# Altium PCB ACF_Out-v2.0.PcbDoc (part 1 of 3)
Units mm, origin at the board's own origin, x right, y up, seen from the top; angles counter-clockwise.
Board outline 145.27 x 100 mm, 2 copper layers (Top Layer, Bottom Layer), stack 1.57 mm thick; 63 components, 69 nets, 230 pads, 136 vias.
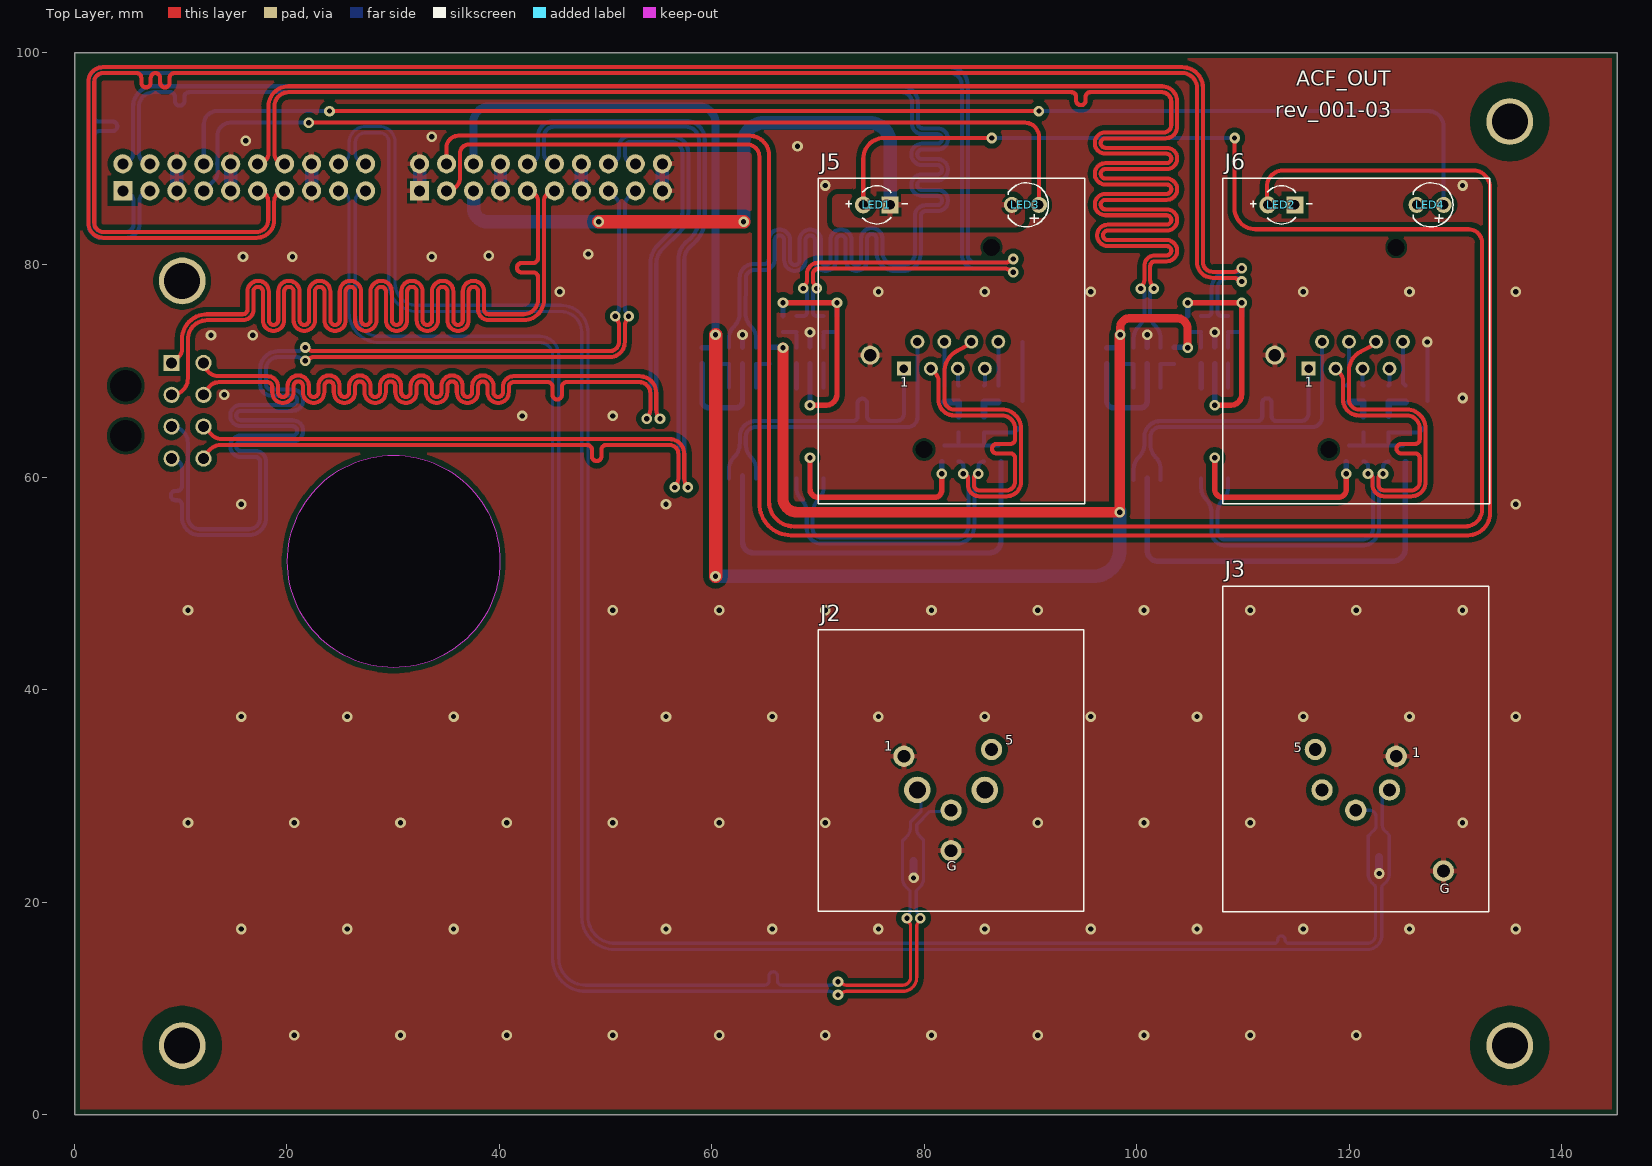
[diagram p0: Top Layer view]
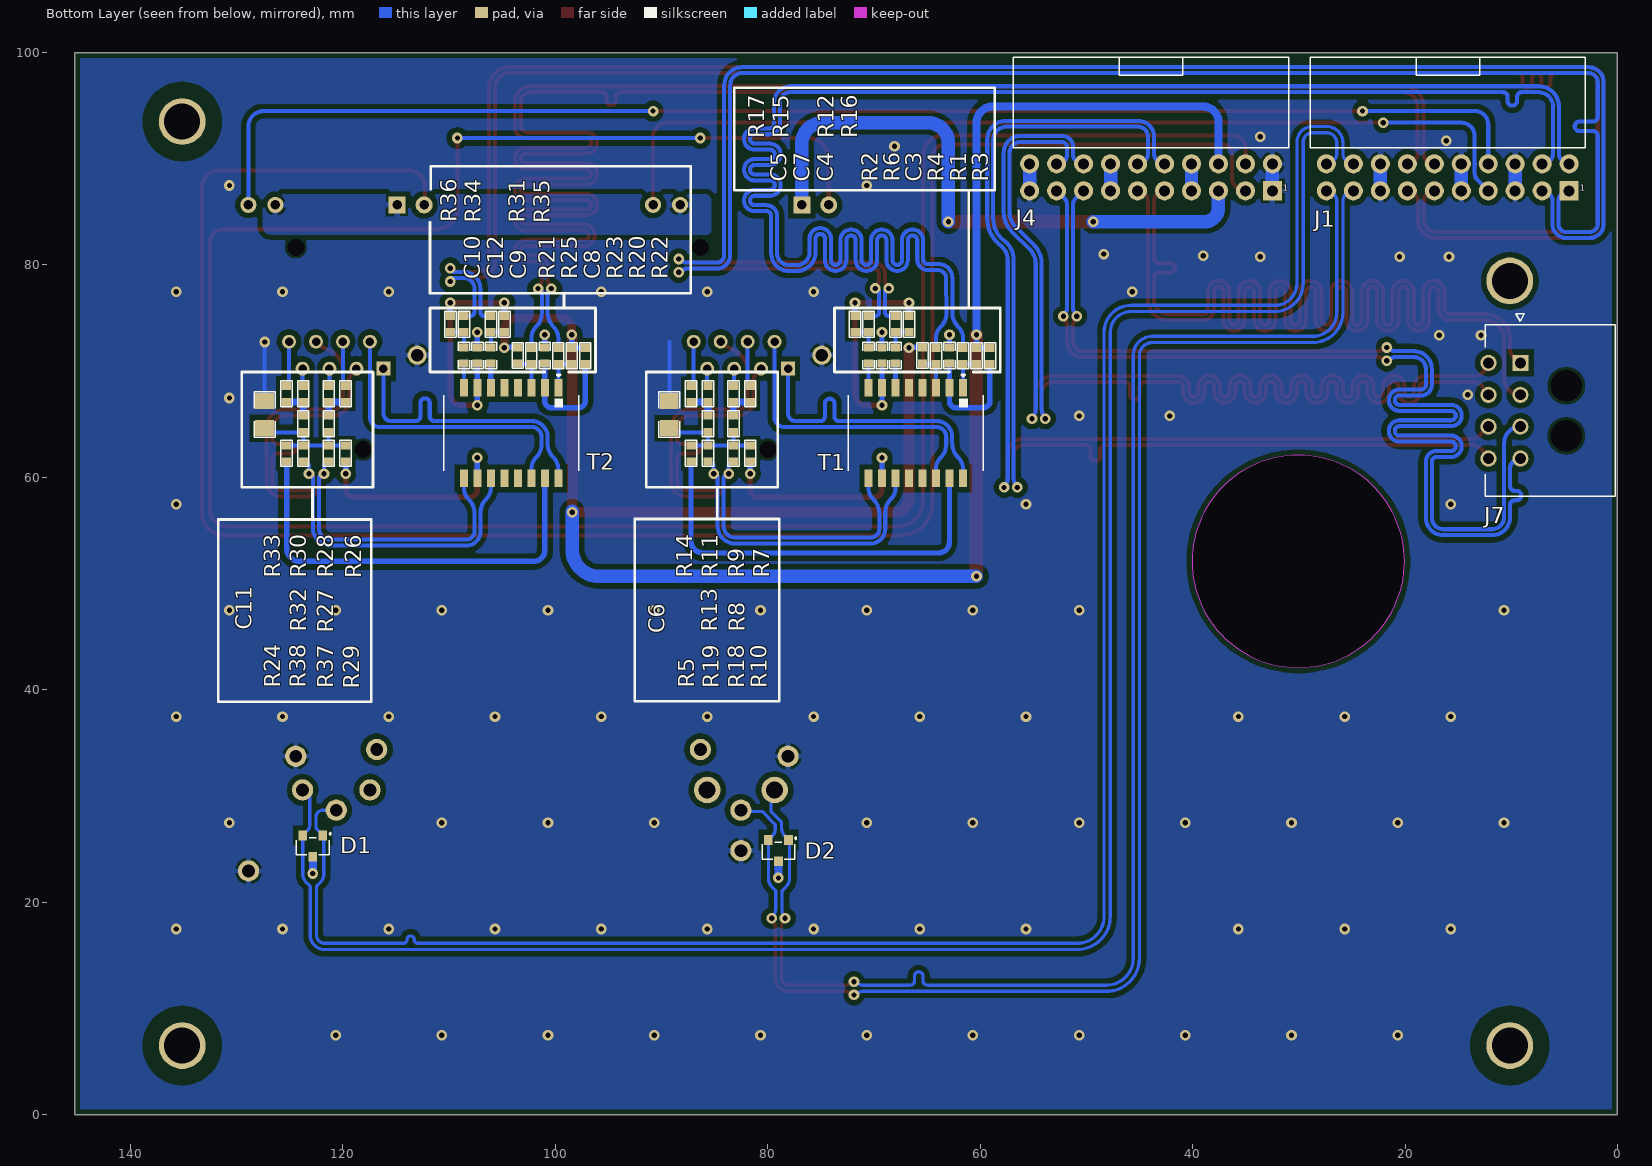
[diagram p1: Bottom Layer view, seen from below]
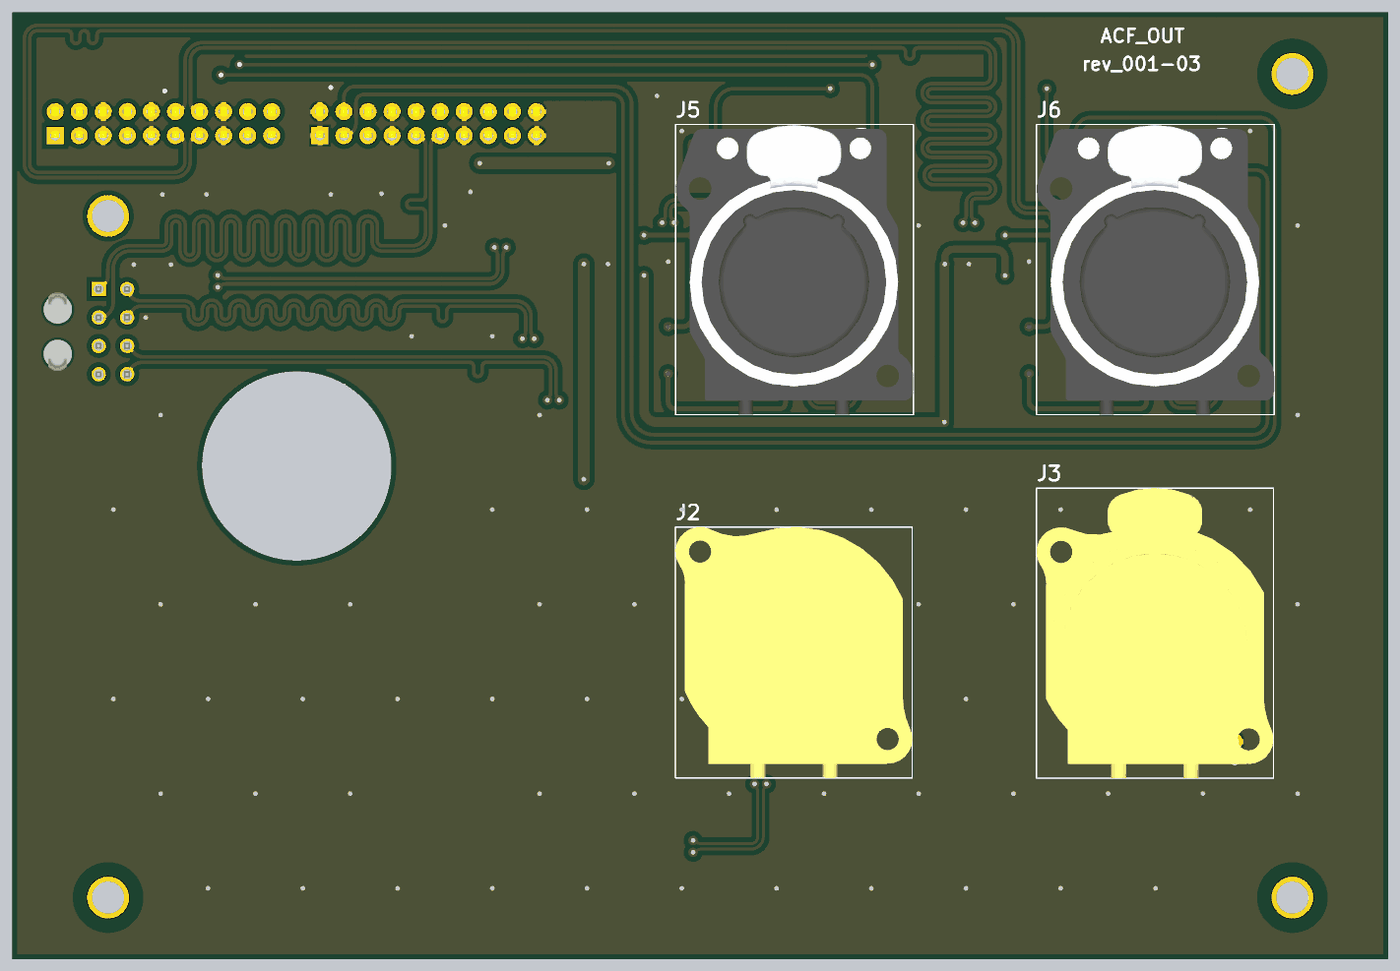
[diagram p3: 3D render of the assembled board from above, using the file's embedded part models]
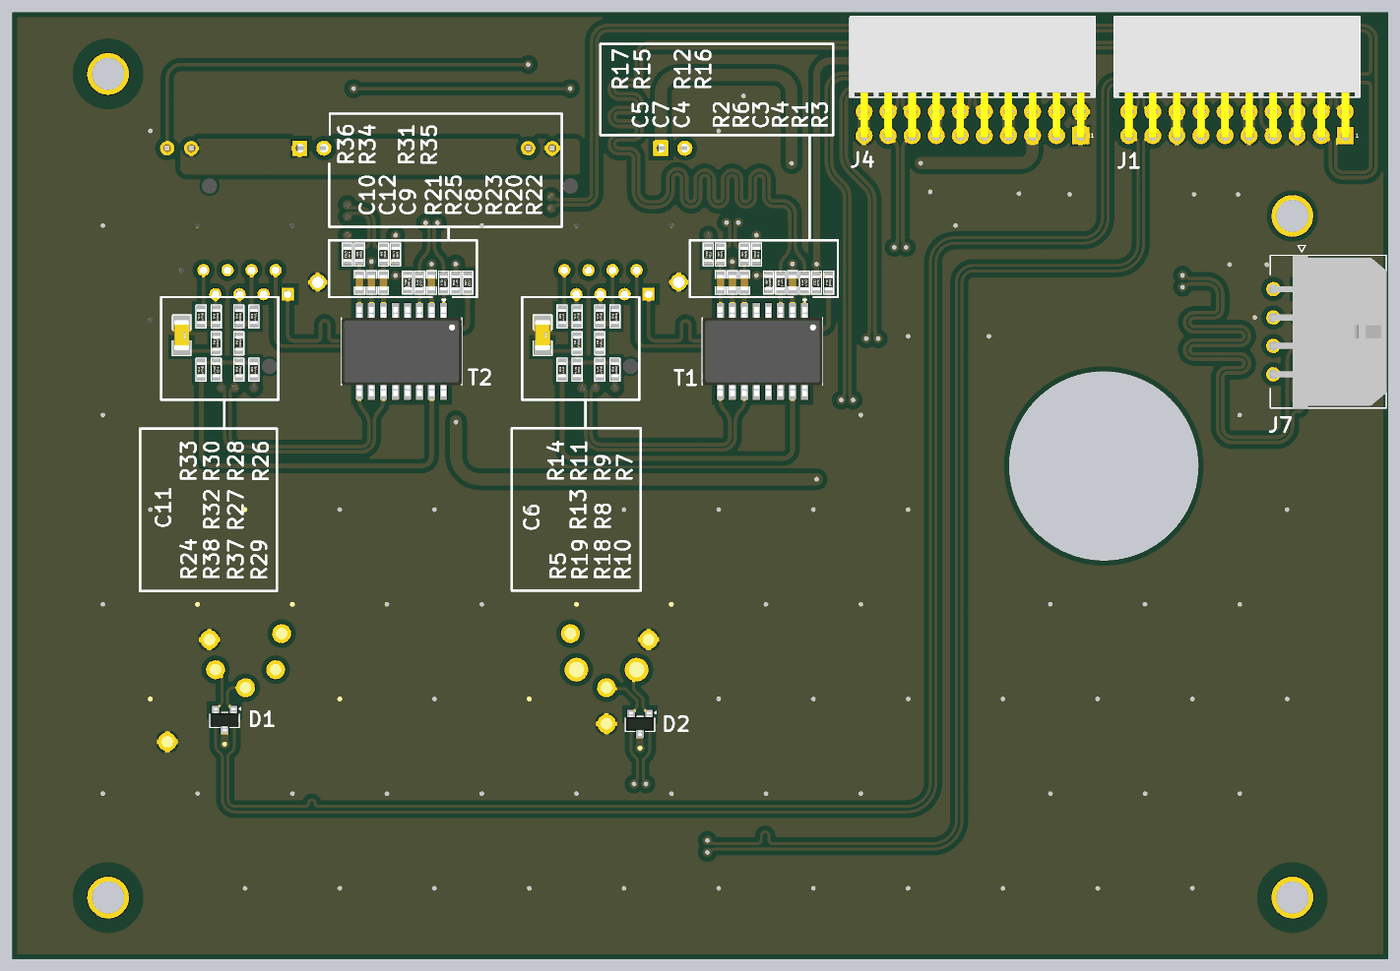
[diagram p4: 3D render of the assembled board from below, using the file's embedded part models]

## Layer stack, top to bottom
Top Solder: solder mask 0.025, SM-004, Dk 4
Top Layer: signal copper 0.035
Dielectric 1: dielectric 1.5, FR-4, Dk 4.8
Bottom Layer: signal copper 0.035
Bottom Solder: solder mask 0.025, SM-004, Dk 4

## Board outline
0,0 0,100 145.27,100 145.27,0
cut-out: 30.05,42.09 cw(c30.05,52.09) 20.05,52.09 cw(c30.05,52.09) 30.05,62.09 cw(c30.05,52.09) 40.05,52.09 cw(c30.05,52.09)

## Design rules (kind name [scope] priority, off if disabled: settings)
BoardOutlineClearance [All] p1: gap=0 ignorepadtopadclearanceinfootprint=FALSE except(0.508: Poly-OutlineEdge)
Clearance [All] p1: gap=0.254 ignorepadtopadclearanceinfootprint=FALSE except(0.152: SMDPad-SMDPad; 0.178: Arc-Arc Arc-Track Arc-SMDPad Arc-THPad Arc-Fill Track-Track Track-SMDPad Track-THPad Track-Fill SMDPad-Fill SMDPad-Region Fill-Fill Fill-Region; 0.508: Arc-Poly Track-Poly SMDPad-Poly THPad-Poly Via-Poly Fill-Poly Poly-Poly Poly-Region)
ComponentClearance [All] p1: gap=0 collisioncheckmode=3 verticalgap=0 showdistances=FALSE
DiffPairsRouting Diff_DMX [InDifferentialPairClass('DIFF-DMX-120')] p1: maxlimit=0.279 minlimit=0.279 mostfreqgap=0.279 toplayer_minwidth=0.305 toplayer_maxwidth=0.305 toplayer_prefwidth=0.305 bottomlayer_minwidth=0.305 bottomlayer_maxwidth=0.305 bottomlayer_prefwidth=0.305 impedanceprofiledriven=TRUE impedanceprofileid={4F365DF2-B3F3-4FB0-96D1-3B1FAD77D494} impedanceprofilevalue=120.000000 maxuncoupledlength=30
DiffPairsRouting Diff_ETH1 [InDifferentialPairClass('DIFF-ETH-100')] p2: maxlimit=0.178 minlimit=0.178 mostfreqgap=0.178 toplayer_minwidth=0.381 toplayer_maxwidth=0.381 toplayer_prefwidth=0.381 bottomlayer_minwidth=0.381 bottomlayer_maxwidth=0.381 bottomlayer_prefwidth=0.381 impedanceprofiledriven=TRUE impedanceprofileid={3366D138-F6F0-4418-872E-3D7843BC3837} impedanceprofilevalue=100.000000 maxuncoupledlength=19.05
Height [All] p1: minheight=0 maxheight=100 prefheight=12.7
HoleSize [All] p1: absolutevalues=TRUE maxlimit=25.4 minlimit=0.025 maxpercent=80.000 minpercent=20.000
HoleToHoleClearance [All] p1: gap=0 allowstackedmicrovias=TRUE
MatchedLengths "Schematic Matched Net Lengths_2" [InDifferentialPairClass('DIFF-DMX-120')] p1: tolerance=0.508 checknetsindiffpair=TRUE checkdiffpairvsdiffpair=FALSE checkxsignals=FALSE checkothers=FALSE
MatchedLengths "Schematic Matched Net Lengths" [InDifferentialPairClass('DIFF-ETH-100')] p2: tolerance=0.508 checknetsindiffpair=TRUE checkdiffpairvsdiffpair=FALSE checkxsignals=FALSE checkothers=FALSE
MaxMinImpedance "Schematic Impedance Constraint_2" [InDifferentialPairClass('DIFF-DMX-120')] p1: minimum=110.0 maximum=120.0
MaxMinImpedance "Schematic Impedance Constraint" [InDifferentialPairClass('DIFF-ETH-100')] p2: minimum=100.0 maximum=110.0
MinimumSolderMaskSliver [All] p1: minsoldermaskwidth=0
PolygonConnect [All] p1: thpad.connectstyle=Relief thpad.reliefconductorwidth=0.508 thpad.reliefentries=4 thpad.polygonreliefangle="90 Angle" thpad.airgapwidth=0.254 smdpad.connectstyle=Direct smdpad.reliefconductorwidth=0.254 smdpad.reliefentries=4 smdpad.polygonreliefangle="90 Angle" smdpad.airgapwidth=0.254 via.connectstyle=Direct via.reliefconductorwidth=0.254 via.reliefentries=4 via.polygonreliefangle="90 Angle" via.airgapwidth=0.254
RoutingVias [All] p1: holewidth=0.3 width=0.6 viastyle="Through Hole" minholewidth=0.3 minwidth=0.6 maxholewidth=0.5 maxwidth=1
ShortCircuit "ShortCircuit - No NET" [InNet('No Net')] p1: allowed=TRUE
SilkToSilkClearance [All] p1: silktosilkclearance=0
SilkToSolderMaskClearance [IsPad] p1: minsilkscreentomaskgap=0 clearancetoexposedcopper=TRUE
SolderMaskExpansion [All] p1: expansion=0.102 istentingtop=FALSE
SupplyNets "Schematic Supply Nets_1" [InNet('3V3')] p1: voltage=0.000
SupplyNets "Schematic Supply Nets_45" [InNet('GND')] p2: voltage=0.000
Width [All] p1: maxlimit=2.54 minlimit=0.203 preferedwidth=0.381 minimp=50.000000 maximp=50.000000 favimp=50.000000
21 further rules are at their usual default settings.

## Classes and differential pairs
differential pair class DIFF-DMX-120: DMX_IN DMX_OUT
differential pair class DIFF-ETH-100: A_CLOCK A_DATA1 A_LATCH A_RXI1 A_TXI1 B_DATA2 B_RXI1 B_TXI1 CLOCK DATA1 DATA2 LATCH RXI1 RXI2 TXI1 TXI2
differential pair DATA1: +DATA1_P -DATA1_N
differential pair LATCH: +LATCH_P -LATCH_N
differential pair DMX_OUT: +DMX_OUT_P -DMX_OUT_N
differential pair DMX_IN: +DMX_IN_P -DMX_IN_N
differential pair CLOCK: +CLOCK_P -CLOCK_N
differential pair DATA2: +DATA2_P -DATA2_N
differential pair TXI2: +TXI2_P -TXI2_N
differential pair TXI1: +TXI1_P -TXI1_N
differential pair RXI2: +RXI2_P -RXI2_N
differential pair RXI1: +RXI1_P -RXI1_N
differential pair B_TXI1: +B_TXI1_P -B_TXI1_N
differential pair B_RXI1: +B_RXI1_P -B_RXI1_N
differential pair A_TXI1: +A_TXI1_P -A_TXI1_N
differential pair A_RXI1: +A_RXI1_P -A_RXI1_N

## Components (designator, comment, footprint, x,y, rotation, side; value= is the part's Value field where it differs from the comment)
C3 "22nF" Cap-0603 62.893,71.473 r270 bottom
C4 "6.8nF" Cap-0603 67.973,71.473 r270 bottom
C5 "6.8nF" Cap-0603 70.513,71.473 r270 bottom
C6 "4.7nF" Cap-1206 89.273,65.913 r270 bottom
C7 "10nF" Cap-0603 69.243,71.473 r270 bottom
C8 "22nF" Cap-0603 100.993,71.473 r270 bottom
C9 "6.8nF" Cap-0603 106.073,71.473 r270 bottom
C10 "6.8nF" Cap-0603 108.613,71.473 r270 bottom
C11 "4.7nF" Cap-1206 127.373,65.913 r270 bottom
C12 "10nF" Cap-0603 107.343,71.473 r270 bottom
D1 "SM712" SOT-23 122.837,25.273 r0 bottom
D2 "SM712" SOT-23 78.994,24.855 r0 bottom
J1 "SSW-110-02-G-D-RA-N" SSW-110-02-G-D-RA-N 15.976,88.255 r180 bottom locked
J2 "NC5MBV-B" NC5MBV-B 82.53,33.11 r0 top locked
J3 "NC5FBV-B" NC5FBV-B 120.63,33.11 r0 top locked
J4 "SSW-110-02-G-D-RA-N" SSW-110-02-G-D-RA-N 43.916,88.255 r180 bottom locked
J5 "NE8FBV-C5-LED" NE8FBV-C5-LED 82.22,74.135 r0 top locked
J6 "NE8FBV-C5-LED" NE8FBV-C5-LED 120.32,74.135 r0 top locked
J7 "43045-0800" 0430450800 8.484,66.275 r90 bottom
LED1 "Emerald" "TH LED 3mm_" 75.53,85.655 r180 top locked
LED2 "Emerald" "TH LED 3mm_" 113.63,85.655 r180 top locked
LED3 "Yellow" "TH LED Yellow 3MM" 89.53,85.655 r180 top locked
LED4 "Yellow" "TH LED Yellow 3MM" 127.63,85.655 r180 top locked
R1 "49.9R" Res-0603 60.353,71.447 r270 bottom
R2 "49.9R" Res-0603 65.433,71.473 r270 bottom
R3 "49.9R" Res-0603 59.083,71.447 r270 bottom
R4 "33R" Res-0603 61.623,71.447 r270 bottom
R5 "75R" Res-0603 87.225,62.255 r270 bottom
R6 "33R" Res-0603 64.163,71.447 r270 bottom
R7 "49.9R" Res-0603 81.645,67.869 r270 bottom
R8 "49.9R" Res-0603 83.241,65.049 r270 bottom
R9 "49.9R" Res-0603 83.241,67.869 r270 bottom
R10 "75R" Res-0603 81.645,62.255 r270 bottom
R11 "49.9R" Res-0603 85.629,67.869 r270 bottom
R12 "33R" Res-0603 67.969,74.433 r270 bottom
R13 "49.9R" Res-0603 85.629,65.049 r270 bottom
R14 "49.9R" Res-0603 87.225,67.869 r270 bottom
R15 "33R" Res-0603 70.513,74.433 r270 bottom
R16 "75R" Res-0603 66.703,74.433 r90 bottom
R17 "75R" Res-0603 71.783,74.433 r90 bottom
R18 "150R" Res-0603 83.241,62.255 r270 bottom
R19 "150R" Res-0603 85.629,62.255 r90 bottom
R20 "49.9R" Res-0603 98.453,71.447 r270 bottom
R21 "49.9R" Res-0603 103.533,71.473 r270 bottom
R22 "49.9R" Res-0603 97.183,71.447 r270 bottom
R23 "33R" Res-0603 99.723,71.447 r270 bottom
R24 "75R" Res-0603 125.325,62.255 r270 bottom
R25 "33R" Res-0603 102.263,71.447 r270 bottom
R26 "49.9R" Res-0603 119.745,67.869 r270 bottom
R27 "49.9R" Res-0603 121.341,65.049 r270 bottom
R28 "49.9R" Res-0603 121.341,67.869 r270 bottom
R29 "75R" Res-0603 119.745,62.255 r270 bottom
R30 "49.9R" Res-0603 123.729,67.869 r270 bottom
R31 "33R" Res-0603 106.069,74.433 r270 bottom
R32 "49.9R" Res-0603 123.729,65.049 r270 bottom
R33 "49.9R" Res-0603 125.325,67.869 r270 bottom
R34 "33R" Res-0603 108.613,74.433 r270 bottom
R35 "75R" Res-0603 104.803,74.433 r90 bottom
R36 "75R" Res-0603 109.883,74.433 r90 bottom
R37 "150R" Res-0603 121.341,62.255 r270 bottom
R38 "150R" Res-0603 123.729,62.255 r90 bottom
T1 "H1102NL" H1102NLT 66.068,64.181 r270 bottom value=350uH
T2 "H1102NL" H1102NLT 104.168,64.181 r270 bottom value=350uH

## Footprints (in the part's own frame and the unit in brackets; to place one, negate y for a bottom-side part, rotate by r counter-clockwise, add the part's x,y. Pads: shape width x height; smd on the part's side, far side on the other; paste and mask are expansions set on the pad)
0430450800 [mm]
  rect 1.52x1.52 hole 1.02 mask+0.076: 1(4.5,0.66)
  round 1.52 hole 1.02 mask+0.076: 2(1.5,0.66) 3(-1.5,0.66) 4(-4.5,0.66) 5(4.5,3.66) 6(1.5,3.66) 7(-1.5,3.66) 8(-4.5,3.66)
  round 0 hole 3 unplated mask+0.076: ""(-2.35,-3.66) ""(2.35,-3.66)
  silkscreen extent -8.07,-8.26 9.12,3.98, body extent -8.08,-8.28 8.08,3.96, height 8.83
Cap-0603 [mil]
  rect 30x35 smd mask+2.36: 1(-30,0) 2(30,0)
  silkscreen extent -49,-21 49,21, body extent -32,-16 31,16, height 34
Cap-1206 [mil] "SMD 1206"
  rect 60x70 smd: 1(-50,0) 2(50,0)
  silkscreen extent -84,-39 84,39, body extent -63,-31 63,32, height 39
H1102NLT [mm]
  rect 1.67x0.76 smd: 1(-4.265,4.445) 2(-4.265,3.175) 3(-4.265,1.905) 4(-4.265,0.635) 5(-4.265,-0.635) 6(-4.265,-1.905) 7(-4.265,-3.175) 8(-4.265,-4.445) 9(4.265,-4.445) 10(4.265,-3.175) 11(4.265,-1.905) 12(4.265,-0.635) 13(4.265,0.635) 14(4.265,1.905) 15(4.265,3.175) 16(4.265,4.445)
  silkscreen extent -5.48,-6.35 3.55,6.35, body extent -4.7,-6.35 4.7,6.35, height 5.97
NC5FBV-B [mm]
  round 2 hole 1.2: 1(3.81,0.635) 2(3.175,-2.54) 3(0,-4.445) 4(-3.175,-2.54) 5(-3.81,1.27) G(8.255,-10.16)
  silkscreen extent -12.5,-14 12.5,16.63, body extent -12.5,-14 12.5,16.63, height 26.5
NC5MBV-B [mm]
  round 2 hole 1.2: 1(-4.445,0.635) 3(0,-4.445) 5(3.81,1.27) G(0,-8.255)
  round 2.5 hole 1.6: 2(-3.175,-2.54) 4(3.175,-2.54)
  silkscreen extent -12.51,-13.97 12.49,12.53, body extent -12.51,-13.97 12.49,12.53, height 26.9
NE8FBV-C5-LED [mm]
  rect 1.308x1.308 hole 0.8: 1(-4.135,-3.9)
  round 1.308 hole 0.8: 2(-2.865,-1.36) 3(-1.595,-3.9) 4(-0.325,-1.36) 5(0.945,-3.9) 6(2.215,-1.36) 7(3.485,-3.9) 8(4.755,-1.36)
  round 1.8 hole 1.2: G(-7.31,-2.63)
  round 0 hole 1.6 unplated: ""(-2.23,-11.52) ""(4.12,7.53)
  silkscreen extent -12.19,-16.63 12.91,14.02, body extent -12.19,-16.64 12.9,13.95, height 30.8
Res-0603 [mil]
  rect 30x35 smd: 1(-30,0) 2(30,0)
  silkscreen extent -48,-21 48,21, body extent -31,-17 31,17, height 18
SOT-23 [mm] "TRANS NPN 40V 0.6A SOT23"
  rect 0.82x0.92 smd: 1(-0.95,-1) 2(0.95,-1) 3(0,1)
  silkscreen extent -1.68,-1.3 1.55,0.81, body extent -1.5,-1.25 1.5,1.25, height 1.05
SSW-110-02-G-D-RA-N [mm]
  rect 1.8x1.8 hole 1.04: 01(11.43,-1.27)
  round 1.8 hole 1.04: 02(11.43,1.27) 03(8.89,-1.27) 04(8.89,1.27) 05(6.35,-1.27) 06(6.35,1.27) 07(3.81,-1.27) 08(3.81,1.27) 09(1.27,-1.27) 10(1.27,1.27) 11(-1.27,-1.27) 12(-1.27,1.27) 13(-3.81,-1.27) 14(-3.81,1.27) 15(-6.35,-1.27) 16(-6.35,1.27) 17(-8.89,-1.27) 18(-8.89,1.27) 19(-11.43,-1.27) 20(-11.43,1.27)
  silkscreen extent -12.96,2.79 12.96,11.3, body extent -12.95,-1.47 12.95,11.3, height 6.25
"TH LED 3mm_" [mm]
  rect 1.6x1.6 hole 0.9: 1(-1.27,0)
  round 1.6 hole 0.9: 2(1.27,0)
  silkscreen extent -2.9,-1.8 2.92,1.8, body extent -1.5,-2 2,2, height 6.25
"TH LED Yellow 3MM" [mil]
  round 60 hole 35.43 paste-99999 mask+2: 1(-50,0) 2(50,0)
  silkscreen extent -85,-82 63,82, body extent -79,-80 61,78, height 205

## Part data
C3 C8: library part CC0603KRX7R9BB223, "CAP CER 0.022UF 50V X7R 0603", Case Code (Imperial)=0603, Case Code (Metric)=1608, Dielectric=X7R, Dielectric Material=Ceramic, Insulation Resistance=100GR, LCSC Part Number=C106222, Manufacturer=Yageo, Max Operating Temperature=125°C, Min Operating Temperature=-55°C, Package Quantity=1, Supplier Part Number 1=311-1370-1-ND, Tolerance=10%, Voltage=50V, Capacitance=22nF, Case/Package=0603, Category="Ceramic Capacitors", ComponentLink1Description=https://datasheet.ciiva.com/8033/70765-8033869.pdf?src-supplier=Element14, ComponentLink1URL=https://datasheet.ciiva.com/8033/70765-8033869.pdf?src-supplier=Element14, ComponentLink2Description=https://datasheet.ciiva.com/28450/1489800-28450639.pdf?src-supplier=Element14, ComponentLink2URL=https://datasheet.ciiva.com/28450/1489800-28450639.pdf?src-supplier=Element14, ComponentLink3Description=https://datasheet.ciiva.com/8033/1489800-8033867.pdf?src-supplier=Element14, ComponentLink3URL=https://datasheet.ciiva.com/8033/1489800-8033867.pdf?src-supplier=Element14, ComponentLink4Description=https://datasheet.ciiva.com/8033/1489800-8033865.pdf?src-supplier=Element14, ComponentLink4URL=https://datasheet.ciiva.com/8033/1489800-8033865.pdf?src-supplier=Element14, ComponentLink5Description=https://datasheet.ciiva.com/156/mlccorderingcode-156178.pdf?src-supplier=Digi-Key, ComponentLink5URL=https://datasheet.ciiva.com/156/mlccorderingcode-156178.pdf?src-supplier=Digi-Key, ComponentLink6Description=https://datasheet.ciiva.com/156/mlccorderingcode-156177.pdf?src-supplier=Digi-Key, ComponentLink6URL=https://datasheet.ciiva.com/156/mlccorderingcode-156177.pdf?src-supplier=Digi-Key, ComponentLink7Description=https://datasheet.ciiva.com/156/mlccorderingcode-156179.pdf?src-supplier=Digi-Key, ComponentLink7URL=https://datasheet.ciiva.com/156/mlccorderingcode-156179.pdf?src-supplier=Digi-Key, ComponentLink8Description=https://datasheet.ciiva.com/11464/upy-gphc-x7r-6-3v-to-50v-8-11464741.pdf?src-supplier=Avnet, ComponentLink8URL=https://datasheet.ciiva.com/11464/upy-gphc-x7r-6-3v-to-50v-8-11464741.pdf?src-supplier=Avnet, Depth=0.8mm, Halogen Free="Halogen Free", Height=0.8mm, Item Type=Capacitor, Lead Free="Lead Free", Length=1.6mm, Manufacturer Part Number=CC0603KRX7R9BB223, Mount="Surface Mount", Number of Pins=2, Packaging="Tape and Reel", Pricing 1="1=0.10000, 10=0.05500, 50=0.03020, 100=0.02460, 500=0.01760, 1000=0.01383 (USD)", Radiation Hardening=No, REACH SVHC="No SVHC", Resistor Type=Ceramic, RoHS=Yes, RoHS Compliant=Yes, Series=CC, Stock 1=119735, Supplier 1=Digi-Key, Termination=SMD/SMT, Thickness=0.035inch, Voltage Rating=50V, Voltage Rating (DC)=50V, Width=0.031inch
C4 C5 C9 C10: library part 0603B682K500NT, "50V 6.8nF X7R ±10% 0603", LCSC Part Number=C1631, Manufacturer=FH, ComponentLink1Description=LCSC, ComponentLink1URL=https://www.lcsc.com/product-detail/Multilayer-Ceramic-Capacitors-MLCC-SMD-SMT_FH-Guangdong-Fenghua-Advanced-Tech-0603B682K500NT_C1631.html, Item Type=Capacitor, Manufacturer Part Number=0603B682K500NT
C6 C11: library part CC1206KKX7RCBB472, "CAP CER 4700PF 1KV X7R 1206", Case Code (Imperial)=1206, Case Code (Metric)=3216, Dielectric=X7R, Dielectric Material=Ceramic, LCSC Part Number=C107198, Manufacturer=Yageo, Max Operating Temperature=125°C, Min Operating Temperature=-55°C, Supplier Part Number 1=7130131, Tolerance=10%, Voltage Rating=1kV, Capacitance=4.7nF, Case/Package=1206, Category="Ceramic Capacitors", ComponentLink1Description=https://datasheet.ciiva.com/13208/upy-gp-np0-16v-to-50v-8-13208693.pdf?src-supplier=Mouser, ComponentLink1URL=https://datasheet.ciiva.com/13208/upy-gp-np0-16v-to-50v-8-13208693.pdf?src-supplier=Mouser, ComponentLink2Description=https://datasheet.ciiva.com/11466/hv-11466701.pdf?src-supplier=Avnet, ComponentLink2URL=https://datasheet.ciiva.com/11466/hv-11466701.pdf?src-supplier=Avnet, Depth=1.6mm, Item Type=Capacitor, Lead Free="Lead Free", Length=3.2mm, Manufacturer Part Number=CC1206KKX7RCBB472, Mount="Surface Mount", Number of Pins=2, Packaging="Tape and Reel", Pricing 1="3000=0.02860, 9000=0.02750, 15000=0.02700, 45000=0.02600, 75000=0.02510 (USD)", Radiation Hardening=No, Resistor Type=Ceramic, RoHS=Yes, RoHS Compliant=Yes, Series=CC, Stock 1=180000, Supplier 1="Future Electronics", Termination=SMD/SMT, Thickness=0.057inch, Voltage Rating (DC)=1kV, Weight=0.000571oz, Width=0.063inch
C7 C12: library part CC0603KRX7R0BB103, "CAP CER 10000PF 100V X7R 0603", Case Code (Imperial)=0603, Case Code (Metric)=1608, Dielectric=X7R, Dielectric Material=Ceramic, LCSC Part Number=C107059, Manufacturer=Yageo, Max Operating Temperature=125°C, Min Operating Temperature=-55°C, Package Quantity=4000, Tolerance=10%, Voltage Rating=100V, Case/Package=0603, ComponentLink1Description=https://datasheet.ciiva.com/8033/1669968-8033774.pdf?src-supplier=Element14, ComponentLink1URL=https://datasheet.ciiva.com/8033/1669968-8033774.pdf?src-supplier=Element14, ComponentLink2Description=https://datasheet.ciiva.com/13389/upy-gphc-x7r-6-3v-to-50v-8-13389353.pdf?src-supplier=Mouser, ComponentLink2URL=https://datasheet.ciiva.com/13389/upy-gphc-x7r-6-3v-to-50v-8-13389353.pdf?src-supplier=Mouser, ComponentLink3Description=https://datasheet.ciiva.com/17458/upy-np0x7r-mv-100-to-630v-9-17458073.pdf?src-supplier=Future+Electronics, ComponentLink3URL=https://datasheet.ciiva.com/17458/upy-np0x7r-mv-100-to-630v-9-17458073.pdf?src-supplier=Future+Electronics, ComponentLink4Description=https://datasheet.ciiva.com/26829/getdatasheetpartid-626135-26829418.pdf?src-supplier=Verical, ComponentLink4URL=https://datasheet.ciiva.com/26829/getdatasheetpartid-626135-26829418.pdf?src-supplier=Verical, Construction=Flat, Depth=0.8mm, Height=0.8mm, Item Type=Capacitor, Lead Free="Lead Free", Length=1.6mm, Manufacturer Part Number=CC0603KRX7R0BB103, Mounting Technology="Surface Mount", Packaging="Tape and Reel", Pricing="4000=0.0051, 16000=0.0048, 60000=0.0045, 160000=0.0043, 400000=0.0041 (USD)", Radiation Hardening=No, Reach SVHC Compliant=Unknown, RoHS=Yes, RoHS Compliant=Yes, Series=CC, Stock=788000, Supplier="Future Electronics", Termination=SMD/SMT, Thickness=0.035inch, Voltage Rating (DC)=100V, Width=0.031inch
D1 D2: "SOT-23 TVS ROHS", LCSC Part Number=C521963, Manufacturer="TECH PUBLIC", Package=SOT-23, ComponentLink1Description=LCSC, ComponentLink1URL=https://www.lcsc.com/product-detail/TVS_TECH-PUBLIC-SM712_C521963.html, Item Type=Diode, Manufacturer Part Number=SM712
J1 J4: "CONN RCPT 20POS 0.1 GOLD PCB R/A", Manufacturer=Samtec, ComponentLink1Description=ftp://ftp.samtec.com/webfiles/PDF/SSQ_TH.PDF?src-supplier=Avnet, ComponentLink1URL=ftp://ftp.samtec.com/webfiles/PDF/SSQ_TH.PDF?src-supplier=Avnet, ComponentLink2Description=https://datasheet.octopart.com/SSW-110-02-G-D-RA-N-Samtec-datasheet-160481827.pdf?src-supplier=Toby+Electronics, ComponentLink2URL=https://datasheet.octopart.com/SSW-110-02-G-D-RA-N-Samtec-datasheet-160481827.pdf?src-supplier=Toby+Electronics, ComponentLink3Description=https://datasheet.octopart.com/SSW-110-02-G-D-RA-N-Samtec-datasheet-118235309.pdf?src-supplier=Sager+Electronics, ComponentLink3URL=https://datasheet.octopart.com/SSW-110-02-G-D-RA-N-Samtec-datasheet-118235309.pdf?src-supplier=Sager+Electronics, ComponentLink4Description=https://datasheet.octopart.com/SSW-110-02-G-D-RA-N-Samtec-datasheet-184263327.pdf?src-supplier=Master+Electronics, ComponentLink4URL=https://datasheet.octopart.com/SSW-110-02-G-D-RA-N-Samtec-datasheet-184263327.pdf?src-supplier=Master+Electronics, Gender=30Gender, Item Type=Connectors, Manufacturer Part Number=SSW-110-02-G-D-RA-N, Pricing="1=3.59, 25=3.5052, 50=3.4236, 100=3.2605, 500=2.43324, 1000=2.11363, 2500=1.908 (USD)", RoHS=Yes, Stock=310, Supplier=Digikey
J2: "XLR Connectors 5P M RECEPT B SER PCBV PN 1 GRD SEP BK", Manufacturer=Neutrik, Supplier Part Number=568-NC5MBV-B, ComponentLink1Description=https://datasheet.ciiva.com/30093/nc5mbv-b-neutrik-30093926.pdf?src-supplier=Onlinecomponents.com, ComponentLink1URL=https://datasheet.ciiva.com/30093/nc5mbv-b-neutrik-30093926.pdf?src-supplier=Onlinecomponents.com, Item Type="Audio / Video Connectors", Manufacturer Part Number=NC5MBV-B, Pricing="1=8.81, 10=8.81, 50=8.81, 100=8.81, 1000=6.68, 10000=6.68 (USD)", RoHS=Yes, Stock=99, Supplier=Mouser
J3: "XLR Connectors 5P M RECEPT B SER PCBV PN 1 GRD SEP BK", Manufacturer=Neutrik, Supplier Part Number=568-NC5FBV-B, ComponentLink1Description=https://datasheet.ciiva.com/30205/nc5fbv-b-neutrik-30205399.pdf?src-supplier=Onlinecomponents.com, ComponentLink1URL=https://datasheet.ciiva.com/30205/nc5fbv-b-neutrik-30205399.pdf?src-supplier=Onlinecomponents.com, Item Type=Connectors, Manufacturer Part Number=NC5FBV-B, Pricing="1=8.46, 10=8.46, 50=8.46, 100=8.46, 1000=6.34, 10000=6.34 (USD)", RoHS=Yes, Stock=259, Supplier=Mouser
J5 J6: "Modular Connectors / Ethernet Connectors RECP CAT5e B series PCBV, 24mm FP to PCB", Manufacturer=Neutrik, Supplier Part Number=568-NE8FBV-C5-LED, ComponentLink1Description=http://www.alliedelec.com/images/products/datasheets/bm/NEUTRIK_PRODUCTS/70624710.pdf?src-supplier=Allied+Electronics, ComponentLink1URL=http://www.alliedelec.com/images/products/datasheets/bm/NEUTRIK_PRODUCTS/70624710.pdf?src-supplier=Allied+Electronics, ComponentLink2Description=http://www.farnell.com/datasheets/2040666.pdf?src-supplier=Element14, ComponentLink2URL=http://www.farnell.com/datasheets/2040666.pdf?src-supplier=Element14, ComponentLink3Description=https://datasheet.octopart.com/NE8FBV-C5-LED-Neutrik-datasheet-62313259.pdf?src-supplier=Newark, ComponentLink3URL=https://datasheet.octopart.com/NE8FBV-C5-LED-Neutrik-datasheet-62313259.pdf?src-supplier=Newark, Item Type="Modular / Ethernet Connectors", Manufacturer Part Number=NE8FBV-C5-LED, Pricing="1=12.51, 10=11.24, 50=11.24, 100=9.55, 1000=9.54, 10000=9.54 (USD)", RoHS=Yes, Stock=1959, Supplier=Mouser
J7: "CONN HEADER R/A 8POS 3MM", Case/Package=SMC, Color=Black, Contact Resistance=10mR, Current Rating=5A, Flammability Rating="UL94 V-0", Manufacturer=Molex, Max Operating Temperature=105°C, Max Voltage Rating (DC)=250.25kV, Min Operating Temperature=-40°C, Package Quantity=1440, Voltage Rating=600V, Voltage Rating (AC)=250V, Approvals=UL,CSA,TUV, ComponentLink1Description=https://datasheet.ciiva.com/11751/0900766b80027348-11751142.pdf?src-supplier=Rs, ComponentLink1URL=https://datasheet.ciiva.com/11751/0900766b80027348-11751142.pdf?src-supplier=Rs, ComponentLink2Description=https://datasheet.ciiva.com/14155/04402310-14155206.pdf?src-supplier=Distrelec, ComponentLink2URL=https://datasheet.ciiva.com/14155/04402310-14155206.pdf?src-supplier=Distrelec, ComponentLink3Description=https://datasheet.ciiva.com/1443/1850016-1443537.pdf?src-supplier=Element14, ComponentLink3URL=https://datasheet.ciiva.com/1443/1850016-1443537.pdf?src-supplier=Element14, Contact Material=Brass,Tin, Contact Plating=Tin, Depth=12.2mm, Diameter=3mm, Gender=Male, Glow Wire Compliant=Compliant, Halogen Free="Low Halogen", Height=8.77mm, Housing Color=Black, Housing Material=Thermoplastic, Item Type="Headers and Wire Housings", Lead Free="Lead Free", Length=16.15mm, Manufacturer Part Number=43045-0800, Material=Polyester, Max Current Rating=5A, Mounting Technology="Through Hole", Number of Circuits=8, Number of Contacts=8, Number of Poles=8, Number of Positions=8, Number of Rows=2, Orientation="Right Angle", Packaging=Tray, Pitch=3mm, Plating=Tin, Pricing="1=0.8079, 10=0.7846, 100=0.7589, 500=0.7388, 1440=0.7241, 5760=0.7046 (USD)", Radiation Hardening=No, Reach SVHC Compliant=Unknown, RoHS=Yes, RoHS Compliant=Yes, Row Spacing=3mm, Series=43045, Stock=99682, Supplier="Arrow Electronics", Supplier Part Number=43045-0800, Termination=Solder, Voltage Rating (DC)=250V, Working Voltage=250V
LED1 LED2: library part NFD3401UGD, "515nm~525nm -30℃~+85℃ Emerald 30° 200mW Plugin,D=3mm Light Emitting Diodes (LED) ROHS", LCSC Part Number=C20618151, Manufacturer="Foshan NationStar Optoelectronics", Package=Plugin,D=3mm, ComponentLink1Description=LCSC, ComponentLink1URL=https://www.lcsc.com/product-detail/Light-Emitting-Diodes-LED_Foshan-NationStar-Optoelectronics-NFD3401URD_C20618148.html, Item Type=LED, Manufacturer Part Number=NFD3401UGD
LED3 LED4: library part NFD3401UYD, "585nm~595nm -30℃~+85℃ Yellow 30° 200mW Plugin,D=3mm Light Emitting Diodes (LED) ROHS", LCSC Part Number=C20618149, Manufacturer="Foshan NationStar Optoelectronics", Package=Plugin,D=3mm, ComponentLink1Description=LCSC, ComponentLink1URL=https://www.lcsc.com/product-detail/Light-Emitting-Diodes-LED_Foshan-NationStar-Optoelectronics-NFD3401UYD_C20618149.html, Item Type=LED, Manufacturer Part Number=NFD3401UYD
R1 R2 R3 R7 R8 R9 R11 R13 R14 R20 R21 R22 R26 R27 R28 R30 R32 R33: library part RC0603FR-0749R9L, "RES 49.9 OHM 1% 1/10W 0603", Case Code (Imperial)=0603, Case Code (Metric)=1608, LCSC Part Number=C114625, Manufacturer=Yageo, Max Operating Temperature=155°C, Max Power Dissipation=100mW, Min Operating Temperature=-55°C, Resistance Tolerance=1%, Resistor Type="Thick Film", Temperature Coefficient=100ppm/°C, Voltage Rating=50V, Case/Package=0603, Category="Chip SMD Resistors", ComponentLink1Description=https://datasheet.ciiva.com/11808/0900766b80f96399-11808223.pdf?src-supplier=RSComponents, ComponentLink1URL=https://datasheet.ciiva.com/11808/0900766b80f96399-11808223.pdf?src-supplier=RSComponents, ComponentLink2Description=https://datasheet.ciiva.com/22747/443971-22747527.pdf?src-supplier=Element14, ComponentLink2URL=https://datasheet.ciiva.com/22747/443971-22747527.pdf?src-supplier=Element14, ComponentLink3Description=https://datasheet.ciiva.com/15189/getdatasheetpartid-325421-15189750.pdf?src-supplier=Verical, ComponentLink3URL=https://datasheet.ciiva.com/15189/getdatasheetpartid-325421-15189750.pdf?src-supplier=Verical, Construction=Rectangular, Depth=0.8mm, Features="Moisture Resistant", Height=0.45mm, Item Type=Resistor, Lead Free="Lead Free", Length=1.6mm, Manufacturer Part Number=RC0603FR-0749R9L, Military Standard=Not, Number of Pins=2, Number of Terminations=2, Packaging="Tape and Reel", Power Rating=100mW, Pricing 1="5000=0.00280 (USD)", REACH SVHC="No SVHC", Resistance=49.9R, RoHS=Yes, RoHS Compliant=Yes, Series=RC, Size Code=0603, Stock 1=2075000, Supplier 1="Arrow Electronics", Supplier Part Number 1=RC0603FR-0749R9L, Technology="THICK FILM", Termination=SMD/SMT, Tolerance=1%, Voltage Rating (DC)=50V
R4 R6 R12 R15 R23 R25 R31 R34: library part RC0603FR-0733RL, "RES SMD 0603 33 Ohm 1% 1/10W", Case Code (Imperial)=0603, Case Code (Metric)=1608, LCSC Part Number=C108661, Manufacturer=Yageo, Max Operating Temperature=155°C, Max Power Dissipation=100mW, Min Operating Temperature=-55°C, Package Quantity=1, Resistance Tolerance=1%, Resistor Type="Thick Film", Supplier Part Number 1=311-33.0HRCT-ND, Temperature Coefficient=100ppm/°C, Voltage Rating=75V, Voltage Rating (DC)=50V, Case/Package=0603, Category="Chip SMD Resistors", ComponentLink1Description=https://datasheet.ciiva.com/11808/0900766b80f96399-11808741.pdf?src-supplier=RSComponents, ComponentLink1URL=https://datasheet.ciiva.com/11808/0900766b80f96399-11808741.pdf?src-supplier=RSComponents, ComponentLink2Description=https://datasheet.ciiva.com/2453/pyu-r-int-thick-7-2453952.pdf?src-supplier=Digi-Key, ComponentLink2URL=https://datasheet.ciiva.com/2453/pyu-r-int-thick-7-2453952.pdf?src-supplier=Digi-Key, ComponentLink3Description=https://datasheet.ciiva.com/2453/pyu-r-int-thick-7-2453953.pdf?src-supplier=Digi-Key, ComponentLink3URL=https://datasheet.ciiva.com/2453/pyu-r-int-thick-7-2453953.pdf?src-supplier=Digi-Key, ComponentLink4Description=https://datasheet.ciiva.com/2453/pyu-r-int-thick-7-2453954.pdf?src-supplier=Digi-Key, ComponentLink4URL=https://datasheet.ciiva.com/2453/pyu-r-int-thick-7-2453954.pdf?src-supplier=Digi-Key, ComponentLink5Description=https://datasheet.ciiva.com/7660/38590-7660792.pdf?src-supplier=Element14, ComponentLink5URL=https://datasheet.ciiva.com/7660/38590-7660792.pdf?src-supplier=Element14, ComponentLink6Description=https://datasheet.ciiva.com/15189/getdatasheetpartid-326673-15189708.pdf?src-supplier=Verical, ComponentLink6URL=https://datasheet.ciiva.com/15189/getdatasheetpartid-326673-15189708.pdf?src-supplier=Verical, ComponentLink7Description=https://datasheet.ciiva.com/7746/443971-7746334.pdf?src-supplier=Element14, ComponentLink7URL=https://datasheet.ciiva.com/7746/443971-7746334.pdf?src-supplier=Element14, ComponentLink8Description=https://datasheet.ciiva.com/7746/443971-7746335.pdf?src-supplier=Element14, ComponentLink8URL=https://datasheet.ciiva.com/7746/443971-7746335.pdf?src-supplier=Element14, ComponentLink9Description=https://datasheet.ciiva.com/46395/443971-46395007.pdf?src-supplier=Element14, ComponentLink9URL=https://datasheet.ciiva.com/46395/443971-46395007.pdf?src-supplier=Element14, Construction=Rectangular, Depth=0.8mm, Features="Moisture Resistant", Height=0.45mm, Item Type=Resistor, Lead Free="Lead Free", Lead Pitch=0.3mm, Length=1.6mm, Manufacturer Part Number=RC0603FR-0733RL, Military Standard=Not, Number of Pins=2, Number of Terminations=2, Packaging="Tape and Reel", Power Rating=100mW, Pricing 1="1=0.10000, 10=0.02400, 100=0.00970, 1000=0.00436, 2500=0.00378 (USD)", REACH SVHC="No SVHC", Resistance=33R, RoHS=Yes, RoHS Compliant=Yes, Series=RC, Size Code=0603, Stock 1=41, Supplier 1=Digi-Key, Technology="THICK FILM", Termination=SMD/SMT, Tolerance=1%, Weight=7.1E-05oz, Width=0.8mm
R5 R10 R16 R17 R24 R29 R35 R36: library part RC0603FR-0775RL, "RES 75 OHM 1% 1/10W 0603", Case Code (Imperial)=0603, Case Code (Metric)=1608, LCSC Part Number=C112309, Manufacturer=Yageo, Max Operating Temperature=155°C, Max Power Dissipation=100mW, Min Operating Temperature=-55°C, Package Quantity=1, Resistance Tolerance=1%, Resistor Type="Thick Film", Supplier Part Number=311-75.0HRCT-ND, Temperature Coefficient=100ppm/°C, Voltage Rating=50V, Case/Package=0603, Category="Chip SMD Resistors", Construction=Rectangular, Depth=0.8mm, Features="Moisture Resistant", Height=0.022inch, Item Type=Resistor, Lead Free=5697LeadFree, Length=0.063inch, Manufacturer Part Number=RC0603FR-0775RL, Military Standard=Not, Number of Terminations=2, Packaging="Tape and Reel", Power Rating=100mW, Pricing="1=0.1, 10=0.019, 50=0.0112, 100=0.0093, 500=0.00622, 1000=0.00532 (USD)", Reach SVHC Compliant=No, RoHS=Yes, RoHS Compliant=Yes, Series=RC, Stock=844005, Supplier=Digikey, Technology="THICK FILM", Termination=SMD/SMT, Tolerance=1%, Voltage Rating (DC)=50V, Width=0.031inch
R18 R19 R37 R38: library part RC0603FR-07150RL, "RES SMD 150OHM 1/10W 0603", Case Code (Imperial)=0603, Case Code (Metric)=1608, LCSC Part Number=C114608, Manufacturer=Yageo, Max Operating Temperature=155°C, Max Power Dissipation=100mW, Min Operating Temperature=-55°C, Package Quantity=5000, Resistance Tolerance=1%, Resistor Type="Thick Film", Supplier Part Number 1=311-150HRCT-ND, Temperature Coefficient=100ppm/°C, Voltage Rating=50V, Case/Package=0603, Category="Chip SMD Resistors", ComponentLink1Description=https://datasheet.ciiva.com/46412/443971-46412844.pdf?src-supplier=Element14, ComponentLink1URL=https://datasheet.ciiva.com/46412/443971-46412844.pdf?src-supplier=Element14, ComponentLink2Description=https://datasheet.ciiva.com/46440/1868787-46440893.pdf?src-supplier=Element14, ComponentLink2URL=https://datasheet.ciiva.com/46440/1868787-46440893.pdf?src-supplier=Element14, ComponentLink3Description=https://datasheet.ciiva.com/12555/rc0603-272842-12555301.pdf?src-supplier=Mouser, ComponentLink3URL=https://datasheet.ciiva.com/12555/rc0603-272842-12555301.pdf?src-supplier=Mouser, Construction=Rectangular, Depth=0.8mm, Features="Moisture Resistant", Height=0.45mm, Lead Free="Lead Free", Length=1.6mm, Manufacturer Part Number=RC0603FR-07150RL, Military Standard=Not, Number of Pins=2, Number of Terminations=2, Packaging="Tape and Reel", Power Rating=100mW, Pricing 1="1=0.10000, 10=0.02400, 100=0.00970, 1000=0.00436, 2500=0.00378 (USD)", REACH SVHC="No SVHC", Resistance=150R, RoHS=Yes, RoHS Compliant=Yes, Series=RC, Size Code=0603, Stock 1=263721, Supplier 1=Digi-Key, Termination=SMD/SMT, Tolerance=1%, Voltage Rating (DC)=50V, Width=0.8mm
T1 T2: "XFRMR MAGNETIC 1PORT 1:1 10/100", Case/Package=Module, DC Resistance (DCR)=650mR, Isolation Voltage=1.5kV, LCSC Part Number=C18584, Manufacturer=Pulse, Max Operating Temperature=70°C, Min Operating Temperature=0°C, Package Quantity=40, Category=Transformers, ComponentLink1Description=https://datasheet.ciiva.com/2938/10-100base-tsingleportsmdmagnetics-rev2008-2938779.pdf?src-supplier=Digikey, ComponentLink1URL=https://datasheet.ciiva.com/2938/10-100base-tsingleportsmdmagnetics-rev2008-2938779.pdf?src-supplier=Digikey, Depth=9.53mm, Height=6.09mm, Height - Seated (Max)=6.22mm, Insertion Loss=-1.1dB, Item Type="RJ45 Transformer", Lead Free="Lead Free", Lead/Base Style="Gull Wing", Length=12.7mm, Manufacturer Part Number=H1102NL, Mounting Technology="Surface Mount", Packaging=Rail/Tube, Pins=16, Pricing="1=3.05066, 10=2.98754, 30=2.92442, 50=2.8613, 100=2.79819, 250=2.73507, 500=2.68247 (USD)", Radiation Hardening=No, Return Loss=-11.5dB, RoHS=Yes, RoHS Compliant=Yes, Series=-, Shielding=Unshielded, Stock=500, Supplier=Avnet, Supplier Part Number=H1102NL, Termination=SMD/SMT, Turns Ratio=1:1, Weight=0.098767oz, Width=7.11mm

## Free pads (board coordinates)
  round 4.4 hole 3.4: MH1(10.135,6.5) MH1(10.135,78.5) MH1(135.135,6.5) MH1(135.135,93.5)

## Via types
v1: diameter 1, hole 0.5, Top Layer to Bottom Layer, tented both sides, 136 vias

## Nets (pads, with @x,y where several pads share a name; then routed paths per layer and width w, separated by ;. In a path a pad name is that pad's centre, name@x,y a point inside that pad or via, vN(x,y) a via of type N, cw(c..) or ccw(c..) an arc to the next point about the centre after c; other vN are vias at no path point)
3V3: J4.06 R1.1 R2.1 R3.1 R20.1 R21.1 R22.1 | length 194.9
  Top Layer w0.762: v1(98.453,73.417) 98.453,74.11 cw(c99.324,74.11) 99.324,74.981 103.803,74.981 cw(c103.803,73.981) 104.803,73.981 v1(104.803,72.209)
  Top Layer w1.016: v1(66.703,72.209) 66.703,58.039 ccw(c68.024,58.039) 68.024,56.718 v1(98.417,56.718) v1@98.417,73.381
  Top Layer w1.27: v1(60.353,50.682) v1(60.353,73.417)
  Bottom Layer w0.508: R3.1@59.083,72.209 R1.1@60.353,72.209 v1(60.353,73.417) ; R2.1@65.433,72.235 v1@66.678,72.235 ; R22.1@97.183,72.209 R20.1@98.453,72.209 v1(98.453,73.417) ; R21.1@103.533,72.235 v1@104.778,72.235
  Bottom Layer w0.762: J4.06@37.566,89.524 37.566,93.483 cw(c38.992,93.483) 38.992,94.91 58.812,94.91 cw(c58.812,93.369) 60.353,93.369 v1(60.353,73.417) ; v1@66.678,72.235 v1(66.703,72.209)
  Bottom Layer w1.27: v1(60.353,50.682) 95.877,50.682 ccw(c95.877,53.222) 98.417,53.222 v1(98.417,56.718) v1@98.417,56.809
A_RXI1_N: J5.6 R18.2 T1.9 | length 55.5
  Top Layer w0.381: v1(83.686,60.344) cw(c83.686,59.92) 84.11,59.92 84.11,59.309 ccw(c85.203,59.309) 85.203,58.216 87.744,58.216 ccw(c87.744,59.587) 89.115,59.587 89.115,64.587 ccw(c87.306,64.587) 87.306,66.396 82.816,66.396 cw(c82.816,67.317) 81.895,67.317 81.895,69.9 cw(c84.184,69.9) 83.111,71.922 84.291,72.548 84.398,72.655 J5.6@84.435,72.775
  Bottom Layer w0.381: T1.9@70.513,59.916 70.513,59.019 cw(c68.995,59.019) 70.068,57.946 ccw(c71.448,56.566) 69.497,56.566 69.497,55.151 ccw(c70.311,55.151) 70.311,54.337 83.075,54.337 ccw(c83.075,55.417) 84.156,55.417 84.156,59.874 ccw(c83.686,59.874) v1(83.686,60.344) 83.686,61.049 ccw(c83.241,61.049) 83.31,61.488 ccw(c83.241,61.049) R18.2@83.241,61.493
A_RXI1_P: J5.3 R19.1 T1.11 | length 55.7
  Top Layer w0.381: J5.3@80.625,70.235 81.028,69.832 cw(c80.284,69.088) 81.336,69.088 81.336,67.317 ccw(c82.816,67.317) 82.816,65.837 87.306,65.837 cw(c87.306,64.587) 88.556,64.587 ; v1(85.092,60.344) ccw(c85.092,59.92) 84.668,59.92 84.668,59.309 ccw(c85.203,59.309) 85.203,58.774 87.744,58.774 ccw(c87.744,59.587) 88.556,59.587 88.556,60.964 88.556,61.814 ccw(c88.112,61.814) 88.112,62.258 86.817,62.258 cw(c86.817,62.703) 86.817,63.147 88.112,63.147 ccw(c88.112,63.592) 88.556,63.592 88.556,64.587 ; 88.554,64.671 cw(c87.306,64.587) 88.556,64.587
  Bottom Layer w0.381: T1.11@67.973,59.916 67.973,59.019 ccw(c69.491,59.019) 68.417,57.946 cw(c67.16,56.689) 68.43,57.933 cw(c67.203,56.706) 68.938,56.706 68.938,55.151 ccw(c70.311,55.151) 70.311,53.778 83.09,53.778 ccw(c83.09,55.402) 84.714,55.402 84.714,59.966 cw(c85.092,59.966) v1(85.092,60.344) 85.092,60.957 cw(c85.629,60.957) R19.1@85.629,61.493
A_TXI1_N: J5.2 T1.14 | length 28.5
  Bottom Layer w0.381: T1.14@64.163,59.89 64.163,60.787 ccw(c62.645,60.787) 63.718,61.86 cw(c64.976,63.118) 63.706,61.873 cw(c64.976,63.118) 63.198,63.118 63.198,63.825 cw(c64.114,63.825) 64.114,64.742 78.45,64.742 ccw(c78.45,65.647) 79.355,65.647 J5.2@79.355,72.775
A_TXI1_P: J5.1 T1.16 | length 28.6
  Bottom Layer w0.381: T1.16@61.623,59.89 61.623,60.787 cw(c63.141,60.787) 62.067,61.86 ccw(c60.688,63.24) 62.639,63.24 62.639,63.825 cw(c64.114,63.825) 64.114,65.301 73.093,65.301 73.283,65.301 ccw(c73.283,65.745) 73.728,65.745 73.728,66.964 cw(c74.172,66.964) 74.617,66.964 74.617,65.745 ccw(c75.061,65.745) 75.061,65.301 76.275,65.301 77.374,65.301 ccw(c77.374,66.012) 78.085,66.012 J5.1@78.085,70.235
B_RXI1_N: J6.6 R37.2 T2.9 | length 56
  Top Layer w0.381: v1(121.786,60.344) cw(c121.786,59.92) 122.21,59.92 122.21,59.309 ccw(c123.303,59.309) 123.303,58.216 125.844,58.216 ccw(c125.844,59.587) 127.215,59.587 127.215,64.587 ccw(c125.406,64.587) 125.406,66.396 120.916,66.396 cw(c120.916,67.317) 119.995,67.317 119.995,70.043 cw(c121.995,70.049) 121.057,71.815 122.381,72.517 122.489,72.625 J6.6@122.535,72.775
  Bottom Layer w0.381: T2.9@108.613,59.916 108.613,59.019 cw(c107.095,59.019) 108.168,57.946 ccw(c109.548,56.566) 107.597,56.566 107.597,54.946 ccw(c108.411,54.946) 108.411,54.132 121.19,54.132 ccw(c121.19,55.198) 122.256,55.198 122.256,59.874 ccw(c121.786,59.874) v1(121.786,60.344) 121.786,61.049 ccw(c121.341,61.049) 121.41,61.488 ccw(c121.341,61.049) R37.2@121.341,61.493
B_RXI1_P: J6.3 R38.1 T2.11 | length 56
  Top Layer w0.381: J6.3@118.725,70.235 119.128,69.832 cw(c118.384,69.088) 119.436,69.088 119.436,67.317 ccw(c120.916,67.317) 120.916,65.837 125.406,65.837 cw(c125.406,64.587) 126.654,64.671 cw(c125.406,64.587) 126.656,64.587 126.656,63.592 cw(c126.212,63.592) 126.212,63.147 124.917,63.147 ccw(c124.917,62.703) 124.917,62.258 126.212,62.258 cw(c126.212,61.814) 126.656,61.814 126.656,60.964 126.656,59.587 cw(c125.844,59.587) 125.844,58.774 123.303,58.774 cw(c123.303,59.309) 122.768,59.309 122.768,59.92 cw(c123.192,59.92) v1(123.192,60.344)
  Bottom Layer w0.381: T2.11@106.073,59.916 106.073,59.019 ccw(c107.591,59.019) 106.517,57.946 cw(c105.26,56.689) 106.53,57.933 cw(c105.303,56.706) 107.038,56.706 107.038,54.946 ccw(c108.411,54.946) 108.411,53.573 121.19,53.573 ccw(c121.19,55.198) 122.814,55.198 122.814,59.966 cw(c123.192,59.966) v1(123.192,60.344) 123.192,60.957 cw(c123.729,60.957) R38.1@123.729,61.493
B_TXI1_N: J6.2 T2.14 | length 28.7
  Bottom Layer w0.381: T2.14@102.263,59.741 T2.14@102.263,59.916 102.263,60.787 ccw(c100.745,60.787) 101.818,61.86 cw(c103.076,63.118) 101.806,61.873 cw(c103.076,63.118) 101.298,63.118 101.298,63.825 cw(c102.214,63.825) 102.214,64.742 116.55,64.742 ccw(c116.55,65.647) 117.455,65.647 J6.2@117.455,72.775
B_TXI1_P: J6.1 T2.16 | length 28.8
  Bottom Layer w0.381: T2.16@99.723,59.741 T2.16@99.723,59.916 99.723,60.787 cw(c101.241,60.787) 100.167,61.86 ccw(c98.788,63.24) 100.739,63.24 100.739,63.825 cw(c102.214,63.825) 102.214,65.301 111.193,65.301 111.383,65.301 ccw(c111.383,65.745) 111.828,65.745 111.828,66.999 cw(c112.272,66.999) 112.717,66.999 112.717,65.745 ccw(c113.161,65.745) 113.161,65.301 114.375,65.301 115.474,65.301 ccw(c115.474,66.012) 116.185,66.012 J6.1@116.185,70.235
CLOCK_N: J4.17 J7.4 | length 103.6
  Top Layer w0.381: v1(21.717,70.976) ccw(c21.717,71.38) 22.003,71.094 22.058,71.149 cw(c22.478,70.73) 22.478,71.323 50.387,71.323 ccw(c50.387,72.752) 51.815,72.752 51.815,74.345 cw(c52.597,74.345) 52.044,74.898 ccw(c51.758,75.184) v1(52.163,75.184)
  Bottom Layer w0.381: J7.4@9.144,61.775 cw(c9.144,60.81) 10.109,60.81 10.109,59.947 10.109,59.182 cw(c9.665,59.182) 9.665,58.738 9.509,58.738 ccw(c9.509,58.293) 9.509,57.849 9.665,57.849 cw(c9.665,57.404) 10.109,57.404 10.109,57.214 10.109,56.265 ccw(c11.815,56.265) 11.815,54.559 16.398,54.559 ccw(c16.398,56.195) 18.034,56.195 18.034,61.01 18.034,61.48 ccw(c17.031,61.48) 17.031,62.483 15.665,62.483 cw(c15.665,62.928) 15.665,63.372 20.52,63.372 ccw(c20.52,64.376) 20.52,65.379 15.665,65.379 cw(c15.665,65.824) 15.665,66.268 20.52,66.268 ccw(c20.52,67.271) 20.52,68.275 18.479,68.275 cw(c18.479,68.719) 18.034,68.719 18.034,70.083 18.034,70.196 cw(c19.161,70.196) 19.161,71.323 20.878,71.323 cw(c20.878,70.541) 21.431,71.094 ccw(c21.717,71.38) v1(21.717,70.976) ; v1(52.163,75.184) ccw(c51.758,75.184) 52.044,75.47 51.989,75.525 cw(c52.408,75.945) 51.815,75.945 51.815,85.625 cw(c52.806,85.625) 52.127,86.346 J4.17@52.806,86.984
CLOCK_P: J4.15 J7.3 | length 103.8
  Top Layer w0.381: v1(21.717,72.23) cw(c21.717,71.825) 22.003,72.111 22.058,72.056 ccw(c22.478,72.475) 22.478,71.882 50.387,71.882 ccw(c50.387,72.752) 51.256,72.752 51.256,74.345 ccw(c50.474,74.345) 51.027,74.898 cw(c51.313,75.184) v1(50.909,75.184)
  Bottom Layer w0.381: J7.3@9.144,64.775 cw(c9.144,63.251) 10.668,63.251 10.668,56.265 ccw(c11.815,56.265) 11.815,55.118 16.398,55.118 ccw(c16.398,56.195) 17.475,56.195 17.475,61.01 17.475,61.48 ccw(c17.031,61.48) 17.031,61.925 15.665,61.925 cw(c15.665,62.928) 15.665,63.931 20.52,63.931 ccw(c20.52,64.376) 20.52,64.82 15.665,64.82 cw(c15.665,65.824) 15.665,66.827 20.52,66.827 ccw(c20.52,67.271) 20.52,67.716 18.479,67.716 cw(c18.479,68.719) 17.475,68.719 17.475,70.083 17.475,70.196 cw(c19.161,70.196) 19.161,71.882 20.878,71.882 ccw(c20.878,72.664) 21.431,72.111 cw(c21.717,71.825) v1(21.717,72.23) ; J4.15@50.266,86.984 50.933,86.372 cw(c50.266,85.64) 51.256,85.64 51.256,75.945 cw(c50.663,75.945) 51.082,75.525 51.027,75.47 ccw(c51.313,75.184) v1(50.909,75.184)
DATA1_N: J4.11 J7.2 | length 107.1
  Top Layer w0.381: J7.2@9.144,67.775 ccw(c9.144,69.3) 10.668,69.3 10.668,72.98 cw(c12.487,72.98) 12.487,74.799 15.368,74.799 15.838,74.799 ccw(c15.838,75.803) 16.842,75.803 16.842,77.502 cw(c17.286,77.502) 17.731,77.502 17.731,74.792 ccw(c18.734,74.792) 19.737,74.792 19.737,77.502 cw(c20.182,77.502) 20.626,77.502 20.626,74.792 ccw(c21.629,74.792) 22.633,74.792 22.633,77.502 cw(c23.077,77.502) 23.522,77.502 23.522,74.792 ccw(c24.525,74.792) 25.528,74.792 25.528,77.502 cw(c25.973,77.502) 26.417,77.502 26.417,74.792 ccw(c27.421,74.792) 28.424,74.792 28.424,77.502 cw(c28.868,77.502) 29.313,77.502 29.313,74.792 ccw(c30.316,74.792) 31.32,74.792 31.32,77.502 cw(c31.764,77.502) 32.209,77.502 32.209,74.792 ccw(c33.212,74.792) 34.215,74.792 34.215,77.502 cw(c34.66,77.502) 35.104,77.502 35.104,74.792 ccw(c36.107,74.792) 37.111,74.792 37.111,77.498 cw(c37.555,77.498) 38,77.498 38,75.803 ccw(c39.003,75.803) 39.003,74.799 40.412,74.799 42.26,74.799 ccw(c42.26,76.734) 44.195,76.734 44.195,85.994 cw(c45.186,85.994) J4.11@45.186,86.984
DATA1_P: J4.09 J7.1 | length 107.7
  Top Layer w0.381: J7.1@9.713,71.345 9.713,71.337 9.678,71.302 9.538,71.165 J7.1@9.144,70.775 9.563,71.136 9.713,71.266 ccw(c9.144,72.046) 10.109,72.046 10.109,72.98 cw(c12.487,72.98) 12.487,75.358 15.838,75.358 ccw(c15.838,75.803) 16.283,75.803 16.283,77.502 cw(c17.286,77.502) 18.289,77.502 18.289,74.792 ccw(c18.734,74.792) 19.178,74.792 19.178,77.502 cw(c20.182,77.502) 21.185,77.502 21.185,74.792 ccw(c21.629,74.792) 22.074,74.792 22.074,77.502 cw(c23.077,77.502) 24.081,77.502 24.081,74.792 ccw(c24.525,74.792) 24.97,74.792 24.97,77.502 cw(c25.973,77.502) 26.976,77.502 26.976,74.792 ccw(c27.421,74.792) 27.865,74.792 27.865,77.502 cw(c28.868,77.502) 29.872,77.502 29.872,74.792 ccw(c30.316,74.792) 30.761,74.792 30.761,77.502 cw(c31.764,77.502) 32.767,77.502 32.767,74.792 ccw(c33.212,74.792) 33.656,74.792 33.656,77.502 cw(c34.66,77.502) 35.663,77.502 35.663,74.792 ccw(c36.107,74.792) 36.552,74.792 36.552,77.498 cw(c37.555,77.498) 38.559,77.498 38.559,75.803 ccw(c39.003,75.803) 39.003,75.358 42.26,75.358 ccw(c42.26,76.734) 43.636,76.734 43.636,78.662 43.636,78.853 ccw(c43.192,78.853) 43.192,79.297 42.095,79.297 cw(c42.095,79.742) 42.095,80.186 43.192,80.186 ccw(c43.192,80.631) 43.636,80.631 43.636,81.672 43.636,85.994 ccw(c42.646,85.994) J4.09@42.646,86.984
DATA2_N: J4.12 J7.8 | length 103.6
  Top Layer w0.381: J7.8@12.144,61.775 12.536,62.372 cw(c13.789,61.547) 13.789,63.047 47.193,63.047 48.273,63.047 cw(c48.273,62.603) 48.717,62.603 48.717,61.983 ccw(c49.162,61.983) 49.606,61.983 49.606,62.603 cw(c50.051,62.603) 50.051,63.047 50.886,63.047 56.021,63.047 cw(c56.021,62.223) 56.845,62.223 56.845,59.894 cw(c55.658,59.894) v1(56.498,59.055)
  Bottom Layer w0.381: J4.12@45.186,89.524 cw(c45.186,90.515) 44.195,90.515 44.195,92.074 cw(c45.137,92.074) 45.137,93.016 57.56,93.016 cw(c57.56,91.799) 58.777,91.799 58.777,84.364 cw(c56.162,84.364) 57.898,82.409 57.766,82.294 ; v1(56.498,59.055) cw(c56.902,59.055) 56.616,59.341 56.671,59.396 ccw(c56.252,59.816) 56.845,59.816 56.845,80.485 cw(c59.061,80.485) 57.493,82.05 cw(c58.789,80.757) 57.585,82.136 57.766,82.294
DATA2_P: J4.10 J7.7 | length 103.9
  Top Layer w0.381: J7.7@12.144,64.775 12.927,63.992 ccw(c13.86,64.928) 13.86,63.606 13.862,63.606 56.021,63.606 cw(c56.021,62.223) 57.404,62.223 57.404,59.894 ccw(c58.591,59.894) v1(57.752,59.055)
  Bottom Layer w0.381: J4.10@42.646,89.524 ccw(c42.646,90.515) 43.636,90.515 43.636,92.074 cw(c45.137,92.074) 45.137,93.575 57.56,93.575 cw(c57.56,91.799) 59.336,91.799 59.336,84.364 cw(c56.162,84.364) 58.267,81.989 58.133,81.873 57.952,81.715 ccw(c58.789,80.757) 57.889,81.655 ccw(c59.061,80.485) 57.404,80.485 57.404,59.816 ccw(c57.997,59.816) 57.578,59.396 57.633,59.341 cw(c57.347,59.055) v1(57.752,59.055)
DMX_IN_N: D2.1 J1.19 J2.2 | length 146
  Top Layer w0.305: v1(71.882,12.527) cw(c71.882,12.073) 72.203,12.394 72.238,12.359 ccw(c72.642,12.764) 72.642,12.192 77.978,12.192 ccw(c77.978,12.923) 78.709,12.923 78.709,17.741 ccw(c78.138,17.741) 78.542,18.145 v1@78.507,18.18 ; v1(78.374,18.501) ccw(c78.829,18.501) v1@78.507,18.18
  Bottom Layer w0.305: J1.19@27.406,86.984 ccw(c27.406,86.007) 26.428,86.007 26.428,75.553 ccw(c28.702,75.553) 28.702,73.279 43.81,73.279 cw(c43.81,71.501) 45.588,71.501 45.588,14.732 ccw(c48.128,14.732) 48.128,12.192 63.454,12.192 64.973,12.192 ccw(c64.973,12.598) 65.38,12.598 65.38,13.039 cw(c65.786,13.039) 66.192,13.039 66.192,12.598 ccw(c66.599,12.598) 66.599,12.192 67.564,12.192 71.122,12.192 ccw(c71.122,12.764) 71.526,12.359 71.561,12.394 cw(c71.882,12.073) v1(71.882,12.527) ; D2.1@77.952,25.855 77.952,22.106 ccw(c79.241,22.33) 78.37,21.354 78.554,21.19 cw(c78.351,20.963) 78.656,20.963 78.656,19.181 cw(c77.695,19.181) 78.625,18.94 cw(c77.695,19.181) v1(78.374,18.501) ; D2.1@78.044,25.855 78.325,26.136 ccw(c77.415,27.046) 78.499,26.353 ccw(c77.415,27.046) 78.702,27.046 78.702,27.536 79.689,28.524 79.689,30.236 J2.2@79.355,30.57
DMX_IN_P: D2.2 J1.17 J2.3 | length 146.1
  Top Layer w0.305: v1(71.882,11.273) ccw(c71.882,11.727) 72.203,11.406 72.238,11.44 cw(c72.642,11.036) 72.642,11.608 77.978,11.608 ccw(c77.978,12.923) 79.294,12.923 79.294,17.741 cw(c79.865,17.741) v1@79.461,18.145 ; v1@79.461,18.145 v1@79.495,18.18 ; v1@79.496,18.18 ccw(c79.174,18.501) v1(79.628,18.501)
  Bottom Layer w0.305: J1.17@24.866,86.984 cw(c24.866,86.007) 25.843,86.007 25.843,75.553 ccw(c28.702,75.553) 28.702,72.695 43.81,72.695 cw(c43.81,71.501) 45.004,71.501 45.004,14.732 ccw(c48.128,14.732) 48.128,11.608 71.122,11.608 cw(c71.122,11.036) 71.526,11.44 71.561,11.406 ccw(c71.882,11.727) v1(71.882,11.273) ; v1(79.628,18.501) cw(c80.566,19.438) 79.313,19.004 cw(c80.566,19.438) 79.24,19.438 79.24,20.963 cw(c79.545,20.963) 79.342,21.19 79.526,21.354 ccw(c78.656,22.33) 79.944,22.106 D2.2@79.944,25.855 79.594,26.205 cw(c80.337,26.948) 79.385,26.503 cw(c80.337,26.948) 79.286,26.948 79.286,27.294 80.537,28.546 82.411,28.546 J2.3@82.53,28.665
DMX_OUT_N: D1.2 J1.20 J3.2 | length 188.2
  Bottom Layer w0.305: J1.20@27.406,89.524 cw(c27.406,90.502) 26.428,90.502 26.428,91.478 cw(c27.406,91.478) 27.406,92.456 28.702,92.456 cw(c28.702,91.567) 29.591,91.567 29.591,78.283 ccw(c32.258,78.283) 32.258,75.616 45.796,75.616 cw(c45.796,73.66) 47.752,73.66 47.752,18.669 ccw(c50.876,18.669) 50.876,15.545 121.712,15.545 ccw(c121.712,16.916) 123.083,16.916 123.083,17.012 123.083,19.352 123.083,21.381 cw(c123.388,21.381) 123.185,21.608 123.369,21.772 ccw(c122.499,22.748) 123.787,22.524 D1.2@123.787,26.273 123.529,26.581 123.344,26.749 cw(c123.787,27.236) 123.129,27.236 123.129,29.894 cw(c123.805,29.894) J3.2@123.805,30.57
DMX_OUT_P: D1.1 J1.18 J3.3 | length 188.4
  Bottom Layer w0.305: J1.18@24.866,89.524 ccw(c24.866,90.502) 25.843,90.502 25.843,91.478 cw(c27.406,91.478) 27.406,93.04 28.702,93.04 cw(c28.702,91.567) 30.175,91.567 30.175,78.283 ccw(c32.258,78.283) 32.258,76.2 45.796,76.2 cw(c45.796,73.66) 48.336,73.66 48.336,18.669 ccw(c50.876,18.669) 50.876,16.129 112.793,16.129 112.946,16.129 ccw(c112.946,16.472) 113.289,16.472 113.289,16.482 cw(c113.632,16.482) 113.975,16.482 113.975,16.472 ccw(c114.317,16.472) 114.317,16.129 115.232,16.129 121.712,16.129 ccw(c121.712,16.916) 122.499,16.916 122.499,17.012 122.499,21.381 ccw(c122.194,21.381) 122.397,21.608 122.213,21.772 cw(c123.084,22.748) 121.795,22.524 D1.1@121.795,26.273 ; J3.3@120.63,28.665 121.887,28.665 cw(c121.887,28.007) 122.545,28.007 122.545,27.224 cw(c121.887,27.224) 122.31,26.72 122.145,26.581 D1.1@121.887,26.273
GND: C3.1 C6.1 C7.1 C8.1 C11.1 C12.1 D1.3 D2.3 J1.05 J1.06 J1.09 J1.10 J1.15 J1.16 J2.1 J2.G J3.1 J3.G J4.01 J4.02 J4.07 J4.08 J4.13 J4.14 J4.19 J4.20 J5.G J6.G | length 36.9
  Bottom Layer w0.381: C6.1@89.273,67.183 89.273,72.742 ; C11.1@127.373,67.183 v1(127.373,72.742)